# Altium PCB FMUM.PcbDoc (part 4 of 4)
Units mm, origin at the board's own origin, x right, y up, seen from the top; angles counter-clockwise.
Board outline 36 x 29 mm, 8 copper layers (Top Layer, GND1, Signal1, GND2, PWR1, Signal2, GND3, Bottom Layer), stack 1.01 mm thick; 117 components, 167 nets, 719 pads, 811 vias.
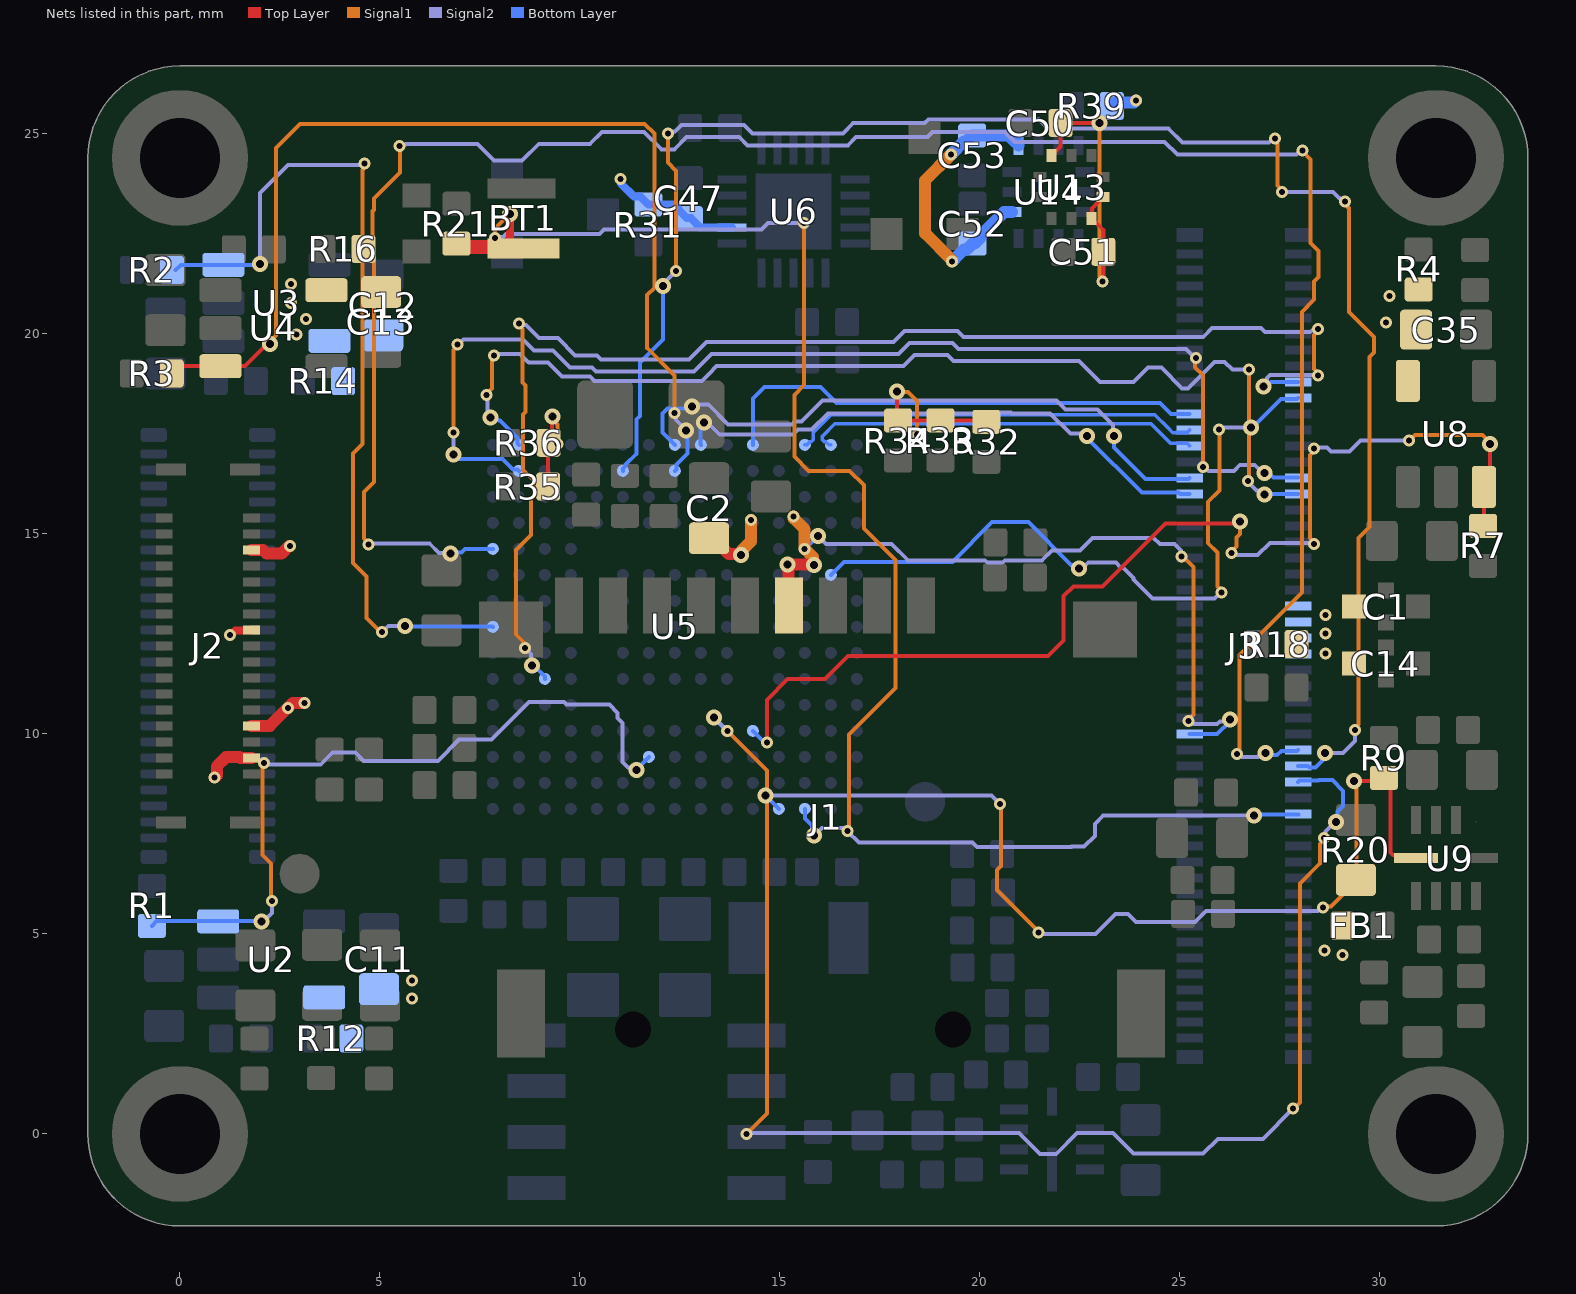
[diagram p10: the nets of this part, all layers, seen from the top]

## Via types
v1: diameter 0.3, hole 0.15, Top Layer to Bottom Layer, tented both sides, 279 vias
v2: diameter 0.3, hole 0.15, Signal1 to Signal2, tented both sides, 267 vias
v3: diameter 0.4, hole 0.2, Signal2 to Bottom Layer, tented both sides, 209 vias
v4: diameter 0.4, hole 0.2, Top Layer to Signal1, tented both sides, 54 vias
v5: diameter 0.3, hole 0.15, Top Layer to Bottom Layer, tented top, 2 vias

## Nets (pads, with @x,y where several pads share a name; then routed paths per layer and width w, separated by ;. In a path a pad name is that pad's centre, name@x,y a point inside that pad or via, vN(x,y) a via of type N, cw(c..) or ccw(c..) an arc to the next point about the centre after c; other vN are vias at no path point) (continued)
USART2_TX_TELEM3: J3.40 U5.C11 | length 17
  Signal1 w0.1: v2(25.039,14.432) 25.084,14.386 25.123,14.386 25.334,14.176 25.334,10.48 25.209,10.355 v2(25.209,10.322)
  Signal2 w0.1: v3(15.948,14.952) 15.953,14.952 16.156,14.748 17.793,14.748 18.199,14.342 18.465,14.342 20.132,14.342 20.191,14.283 20.564,14.283 20.623,14.342 21.557,14.342 21.798,14.583 22.502,14.583 22.818,14.899 24.341,14.899 24.496,14.744 24.868,14.744 25.027,14.584 25.027,14.524 25.039,14.513 v2(25.039,14.432) ; v2(25.209,10.322) 25.263,10.322 25.342,10.243 25.93,10.243 26,10.313 26.202,10.313 v3(26.249,10.359)
  Bottom Layer w0.1: U5.C11@15.623,14.627 v3(15.948,14.952) ; J3.40@25.245,10 25.249,9.996 25.93,9.996 26.249,10.314 v3(26.249,10.359)
USART3_RX_DEBUG: J3.71 U5.P14 | length 29.3
  Signal1 w0.1: v2(6.845,17.541) 6.845,19.592 6.934,19.682 v2(6.934,19.736) ; v2(25.397,19.402) 25.382,19.387 25.382,19.163 25.572,18.973 v2(25.571,16.67) v2(25.571,16.67)
  Signal2 w0.1: v3(6.845,16.991) v2(6.845,17.541) ; v2(6.934,19.736) 6.971,19.736 7.093,19.858 8.581,19.858 8.852,19.588 9.322,19.588 9.328,19.587 9.75,19.165 9.903,19.165 10.304,19.165 10.406,19.063 12.856,19.063 13.286,19.493 17.961,19.493 18.242,19.774 19.318,19.774 19.468,19.625 25.15,19.625 25.373,19.402 v2(25.397,19.402) ; v2(25.571,16.67) 25.625,16.67 25.716,16.578 26.347,16.578 26.498,16.729 26.869,16.729 27.069,16.529 v3(27.113,16.529)
  Bottom Layer w0.1: v3(6.845,16.991) 6.96,16.877 8.063,16.877 8.324,16.615 8.434,16.615 U5.P14@8.473,16.577 ; v3(27.113,16.529) 27.171,16.472 27.27,16.472 27.335,16.407 J3.71@27.948,16.407
USART3_TX_DEBUG: J3.69 U5.P15 | length 27.4
  Signal1 w0.1: v2(7.67,18.478) 7.67,18.5 7.808,18.637 7.808,19 7.808,19.364 7.848,19.404 v2(7.848,19.458) ; v2(26.703,16.329) 26.721,16.347 v2(26.721,19.107)
  Signal2 w0.1: v2(7.67,18.478) 7.689,18.46 7.689,18.061 7.763,17.986 v3(7.763,17.905) ; v2(7.848,19.458) 7.886,19.496 8.498,19.496 8.699,19.295 8.72,19.295 8.728,19.288 9.198,19.288 9.485,19 9.547,18.939 10.247,18.939 10.363,18.823 13.047,18.823 13.224,19 13.417,19.193 18.085,19.193 18.366,19.474 19.194,19.474 19.343,19.325 22.482,19.325 23.007,18.8 23.845,18.8 24.205,19.16 24.536,19.16 25.057,18.64 25.201,18.64 25.865,19.304 26.113,19.304 26.31,19.107 v2(26.721,19.107) ; v2(26.703,16.329) 26.703,16.303 26.918,16.089 26.936,16.089 27.034,15.991 v3(27.115,15.991)
  Bottom Layer w0.1: v3(7.763,17.905) 7.821,17.848 7.955,17.848 7.972,17.831 8,17.831 8.434,17.397 8.434,17.265 U5.P15@8.473,17.227 ; v3(27.115,15.991) 27.119,15.995 J3.69@27.95,15.995
USART6_RX_FROM_IO__RC_INPUT: J3.70 U5.G15 | length 14
  Signal2 w0.1: v3(13.108,17.784) 13.189,17.784 13.485,17.488 15.332,17.488 15.449,17.605 15.789,17.605 16.201,18.016 18.465,18.016 19.95,18.016 19.967,18.033 20.777,18.033 20.794,18.016 21.757,18.016 22.265,17.509 22.621,17.509 v3(22.678,17.452)
  Bottom Layer w0.1: U5.G15@13.023,17.227 13.011,17.239 13.011,17.606 13.108,17.703 v3(13.108,17.784) ; v3(22.678,17.452) 22.678,17.403 24.046,16.035 24.965,16.035 25,16 J3.70@25.245,16
USART6_TX_TO_IO__NC: J3.72 U5.H15 | length 15.8
  Signal2 w0.1: v3(12.808,18.184) 12.865,18.242 13.206,18.242 13.706,17.741 15.303,17.741 15.366,17.805 15.537,17.805 16.065,18.333 18.465,18.333 21.918,18.333 22.136,18.115 22.941,18.115 23.33,17.727 23.33,17.472 v3(23.35,17.452)
  Bottom Layer w0.1: U5.H15@12.373,17.227 12.065,17.534 12.065,18.013 12.191,18.138 12.761,18.138 v3(12.808,18.184) ; v3(23.35,17.452) 23.35,17.156 24.136,16.369 25.214,16.369 J3.72@25.245,16.4
USB_D_N: J3.78 U5.C15 | length 10.3
  Bottom Layer w0.089: U5.C15@15.623,17.227 15.677,17.227 15.75,17.3 15.774,17.3 15.833,17.358 15.833,17.536 16.278,17.982 24.373,17.982 24.706,17.648 24.824,17.531 24.906,17.531 24.91,17.535 25.18,17.535 J3.78@25.245,17.6
USB_D_P: J3.76 U5.B15 | length 9.9
  Bottom Layer w0.089: U5.B15@16.273,17.227 16.219,17.227 16.146,17.3 16.121,17.3 16.063,17.358 16.063,17.441 16.373,17.752 24.278,17.752 24.476,17.553 24.764,17.265 25.18,17.265 J3.76@25.245,17.2
V_RTC_BAT: BT1.1 J3.29 R21.2 U5.C1 | length 43.4
  Top Layer w0.2: v4(8.25,23) 8.25,22.276 8.224,22.25 7,22.25 7.148,22.102 8.554,22.102 BT1.1@8.591,22.138
  Signal1 w0.1: v2(7.883,22.4) 7.883,22.633 v4(8.25,23) ; v2(15.604,22.768) 15.604,18.72 15.36,18.476 15.36,16.933 15.717,16.575 16.742,16.575 17.097,16.221 17.097,15.133 17.884,14.346 17.884,11.148 16.727,9.99 16.727,7.604 v2(16.694,7.571)
  Signal2 w0.1: v2(7.883,22.4) 7.912,22.429 8.083,22.429 8.154,22.5 10.49,22.5 10.601,22.611 14.542,22.611 14.699,22.768 v2@15.604,22.768 ; v3(15.846,7.459) 15.865,7.459 16.054,7.649 16.561,7.649 16.639,7.571 v2(16.694,7.571) 16.694,7.563 16.971,7.285 19.818,7.285 19.926,7.177 22.289,7.177 22.293,7.182 22.608,7.182 22.871,7.446 22.871,7.747 23.079,7.955 26.841,7.955 v3(26.852,7.965)
  Bottom Layer w0.1: U5.C1@15.623,8.127 15.631,8.118 15.631,7.886 15.804,7.713 15.804,7.5 v3(15.846,7.459) ; v3(26.852,7.965) 26.877,7.991 J3.29@27.968,7.991
VBUS_SENSE: J3.80 U5.E15 | length 12.5
  Bottom Layer w0.1: U5.E15@14.323,17.227 14.323,18.381 14.614,18.672 16.02,18.672 16.416,18.276 18.465,18.276 ; 18.465,18.276 24.495,18.276 ; 24.495,18.276 24.503,18.276 24.779,18 J3.80@25.245,18
VDD_3V3_SD_CARD: C2.2 FB1.2 J1.4 R20.2 R32.2 R33.2 R34.2 R35.2 R36.2 | length 11.7
  Top Layer w0.1: R35.2@9.208,16.183 9.208,17.513 9.24,17.513 9.297,17.569 9.297,17.929 v4(9.308,17.941) ; v4(17.922,18.555) 17.922,17.868 R34.2@17.955,17.835 18.778,17.835 R33.2@18.786,17.827 ; R33.2@19.013,17.841 R32.2@20.046,17.841
  Top Layer w0.3: C2.2@13.229,14.892 13.329,14.892 13.728,14.493 14.002,14.493 v4(14.021,14.474) ; J1.4@15.229,13.216 15.209,13.236 15.209,14.214 v4(15.19,14.233) 15.834,14.233 v4(15.847,14.219)
  Signal1 w0.1: v4(9.308,17.941) 9.308,17.868 9.444,17.732 v2(9.444,17.254) ; v4(17.922,18.555) 17.935,18.543 18.204,18.543 18.429,18.318 v2(18.429,17.487)
  Signal1 w0.3: v4(14.021,14.474) 14.04,14.493 14.04,14.579 14.272,14.811 14.272,15.34 v2(14.276,15.343) ; v2(15.345,15.44) 15.345,15.391 15.62,15.116 v2(15.62,14.626) 15.828,14.418 15.828,14.239 v4(15.847,14.219)
  other v5: 29.063,4.473 28.612,4.584
VDD_3V3_SD_CARD_EN: R9.1 U5.D1 U9.5 | length 24.8
  Top Layer w0.1: v4(29.35,8.827) R9.1@30.173,8.827 ; R9.1@30.1,8.9 R9.1@30.173,8.827 ; U9.5@30.897,6.898 30.822,6.973 30.343,6.973 30.339,6.977 30.328,6.977 30.27,7.035 30.27,8.73 R9.1@30.173,8.827
  Signal1 w0.1: v2(20.5,8.25) 20.532,8.218 20.532,6.703 20.431,6.601 20.431,6.099 21.47,5.06 v2(21.47,5.038) ; v2(28.582,5.654) 28.612,5.684 28.777,5.684 29.413,6.32 29.413,8.619 29.407,8.624 29.407,8.77 v4(29.35,8.827)
  Signal2 w0.1: v3(14.641,8.458) 20.292,8.458 v2(20.5,8.25) ; v2(21.47,5.038) 21.508,5 22.884,5 23.384,5.5 23.7,5.5 23.9,5.3 25.381,5.3 25.657,5.575 28.449,5.575 28.528,5.654 v2(28.582,5.654)
  Bottom Layer w0.1: v3(14.641,8.458) U5.D1@14.973,8.127
VDD_3V3_SENSORS1: C35.2 C52.2 C53.2 R4.2 R39.2 U8.5 U14.5 U14.8 | length 7.9
  Signal1 w0.3: v1(19.276,24.485) 18.631,23.84 18.631,22.516 19.301,21.845 v1(19.301,21.812)
  Bottom Layer w0.3: v1(19.276,24.485) 19.604,24.813 19.657,24.813 C53.2@19.807,24.963 20.715,24.963 20.88,24.798 20.943,24.798 20.968,24.773 U14.8@20.968,24.71 ; v1(19.301,21.812) 19.354,21.865 19.358,21.865 19.6,22.106 19.666,22.106 C52.2@19.816,22.256 ; C52.2@19.866,22.256 20.016,22.406 20.016,22.456 20.608,23.048 U14.5@20.805,23.048 ; R39.2@23.3,25.7 23.39,25.79 23.852,25.79 v1(23.904,25.841)
  other v1: 30.157,20.286 30.233,20.948
VDD_3V3_SENSORS1_EN: R7.1 U5.E4 U8.3 | length 28.3
  Top Layer w0.1: v1(14.678,9.784) 14.678,10.852 15.193,11.367 16.128,11.367 16.707,11.946 21.705,11.946 22.095,12.336 22.095,13.448 22.334,13.687 23.064,13.687 24.635,15.258 26.452,15.258 v4(26.502,15.307) ; R7.1@32.579,15.202 32.598,15.222 U8.3@32.598,16.176 32.75,16.327 v4(32.75,17.25)
  Signal1 w0.1: v2(26.287,14.528) 26.287,14.561 26.413,14.687 26.413,14.906 26.502,14.995 v4(26.502,15.307) ; v2(28.352,14.75) 28.352,14.804 28.252,14.904 28.252,16.977 28.352,17.077 v2(28.352,17.131) ; v2(30.721,17.339) 30.749,17.339 30.88,17.471 32.559,17.471 32.75,17.279 v4(32.75,17.25)
  Signal2 w0.1: v2(26.287,14.528) 26.325,14.49 26.422,14.49 26.445,14.467 26.944,14.467 27.248,14.771 28.33,14.771 v2(28.352,14.75) ; v2(28.352,17.131) 28.378,17.157 28.682,17.157 28.778,17.061 29.239,17.061 29.517,17.339 v2(30.721,17.339)
  Bottom Layer w0.1: U5.E4@14.323,10.077 14.577,9.822 14.639,9.822 v1(14.678,9.784)
VDD_3V3_SENSORS2: C11.2 C50.2 C51.2 J2.32 R12.2 U2.5 U13.1 U13.5 U13.10 | length 9.5
  Top Layer w0.1: U13.5@21.793,24.46 21.793,24.498 21.868,24.573 21.906,24.573 22.014,24.681 C50.2@22.014,25.273 v4(22.993,25.273) ; U13.10@22.793,22.848 22.868,22.773 22.906,22.773 23.083,22.595 C51.2@23.083,22.054 23.083,21.323 v1(23.07,21.309) ; U13.10@22.793,22.885 22.797,22.889 22.797,23.139 22.968,23.31 22.968,23.348 23.043,23.423 U13.1@23.081,23.423
  Top Layer w0.3: v1(0.866,8.907) 0.922,8.963 0.922,9.188 1.157,9.423 1.488,9.423 1.511,9.4 J2.32@1.79,9.4
  Signal1 w0.1: v4(22.993,25.273) 22.993,21.44 23.07,21.363 v1(23.07,21.309)
  other v1: 5.802,3.38 5.806,3.832
VDD_3V3_SENSORS2_EN: R1.1 U2.3 U5.J3 | length 18.9
  Signal1 w0.1: v2(2.099,9.271) 2.061,9.234 2.061,6.969 2.274,6.756 2.274,5.859 v2(2.305,5.827)
  Signal2 w0.1: v3(2.042,5.314) 2.094,5.314 2.305,5.525 v2(2.305,5.827) ; v2(2.099,9.271) 2.137,9.234 3.52,9.234 3.818,9.531 4.384,9.531 4.587,9.329 6,9.329 6.446,9.329 6.979,9.862 7.79,9.862 8.721,10.793 9.607,10.793 9.669,10.731 10.739,10.731 10.945,10.525 10.945,10.398 11.07,10.274 11.07,9.299 11.207,9.162 11.351,9.162 v3(11.409,9.104)
  Bottom Layer w0.1: R1.1@-0.7,5.2 -0.581,5.319 2.036,5.319 v3(2.042,5.314) ; v3@11.409,9.105 11.723,9.419 U5.J3@11.723,9.427
VDD_3V3_SENSORS3: C12.2 J2.6 R14.2 U3.5 | length 1.1
  Top Layer w0.3: J2.6@1.79,14.6 2.073,14.6 2.167,14.506 2.54,14.506 2.736,14.702 v1(2.756,14.702)
  other v1: 2.917,19.99 3.149,20.375
VDD_3V3_SENSORS3_EN: R2.1 U3.3 U5.R8 | length 21.9
  Signal1 w0.1: v2(4.616,24.262) 4.578,24.224 4.578,24.116 4.565,24.103 4.565,17.246 4.328,17.009 4.328,14.276 4.665,13.94 4.665,12.904 5.015,12.554 v2(5.05,12.554)
  Signal2 w0.1: v3(2,21.75) 2,23.525 2.698,24.224 4.578,24.224 v2(4.616,24.262) ; v2(5.05,12.554) 5.059,12.554 5.209,12.704 v3(5.626,12.704)
  Bottom Layer w0.1: R2.1@-0.107,21.593 0.027,21.727 U3.3@1.088,21.727 1.977,21.727 v3(2,21.75) ; v3(5.626,12.704) 5.641,12.689 7.81,12.689 U5.R8@7.823,12.677
VDD_3V3_SENSORS4: C13.2 C47.2 J2.16 R16.2 R31.2 U4.5 U6.12 | length 3.9
  Top Layer w0.2: v1(1.247,12.476) 1.274,12.476 1.383,12.585 1.775,12.585 J2.16@1.79,12.6
  Bottom Layer w0.2: v1(11.01,23.877) 11.029,23.858 11.029,23.755 11.351,23.433 11.509,23.433 R31.2@11.709,23.233 12.358,23.233 12.475,23.116 12.475,23.093 12.675,22.893 C47.2@12.725,22.893 ; C47.2@12.775,22.893 13.005,22.664 U6.12@13.803,22.664
  other v1: 2.772,20.779 2.772,21.246
VDD_3V3_SENSORS4_EN: R3.1 U4.3 U5.H14 | length 26.2
  Top Layer w0.1: 0.1,19.2 0.108,19.192 U4.3@1.012,19.192 1.023,19.203 1.628,19.203 2.175,19.75 v4(2.25,19.75)
  Signal1 w0.1: v4(2.25,19.75) 2.25,19.809 2.4,19.959 2.4,24.65 3,25.25 11.62,25.25 11.86,25.01 11.86,21.151 11.678,20.969 11.678,19.654 12.332,19 12.37,18.963 v2(12.37,18.026)
  Signal2 w0.1: v2(12.37,18.026) 12.408,17.988 12.408,17.849 12.651,17.605 v3(12.651,17.58)
  Bottom Layer w0.1: U5.H14@12.373,16.577 12.411,16.615 12.411,16.73 12.686,17.006 12.686,17.545 v3(12.651,17.58)
VDD_3V3_SPEKTRUM_POWER_EN: J3.33 U5.F4 | length 36.2
  Signal1 w0.1: v2(13.693,10.069) 14.672,9.089 14.672,6.736 14.672,0.506 v2(14.162,-0.005) ; v2(27.831,0.631) 27.841,0.631 28,0.789 28,6.265 28.501,6.767 28.501,7.247 28.6,7.346 v2(28.6,7.4)
  Signal2 w0.1: v3(13.347,10.415) v2(13.693,10.069) ; v2(14.162,-0.005) 14.19,0.023 20.981,0.023 21.506,-0.502 21.908,-0.502 22.427,0.017 23.33,0.017 23.841,-0.494 25.582,-0.494 25.951,-0.125 27.075,-0.125 v2(27.831,0.631) ; v2(28.6,7.4) 28.638,7.438 28.638,7.557 28.881,7.8 v3(28.9,7.8)
  Bottom Layer w0.1: v3(13.347,10.415) 13.347,10.402 U5.F4@13.673,10.077 ; J3.33@27.955,8.8 27.99,8.835 28.469,8.835 28.479,8.845 28.81,8.845 29.082,8.573 29.082,8.199 28.939,8.056 28.939,7.839 v3(28.9,7.8)
VDD_5V_HIPOWER_nEN: J3.81 U5.B10 | length 18
  Signal1 w0.1: v2(25.972,17.616) 25.989,17.599 25.989,16.089 25.696,15.796 25.696,14.771 25.934,14.533 25.934,13.684 26.034,13.584 v2(26.034,13.53)
  Signal2 w0.1: v3(22.479,14.133) 22.558,14.133 22.708,14.283 23.396,14.283 23.515,14.164 23.577,14.164 23.843,13.898 23.843,13.86 24.315,13.387 25.863,13.387 26.006,13.53 v2(26.034,13.53) ; v2(25.972,17.616) 26.011,17.654 26.124,17.654 26.131,17.662 v3(26.775,17.662)
  Bottom Layer w0.1: U5.B10@16.273,13.977 16.598,14.302 19.31,14.302 20.301,15.293 21.214,15.293 22.279,14.228 22.303,14.228 22.398,14.133 v3(22.479,14.133) ; v3(26.775,17.662) 26.815,17.662 27.53,18.377 27.932,18.377 J3.81@27.955,18.4
VDD_5V_HIPOWER_nOC: J3.83 U5.N6 | length 34.2
  Signal1 w0.1: v2(8.478,20.261) 8.478,20.206 8.566,20.119 8.566,19 8.566,18.791 8.641,18.716 8.641,18.05 8.582,17.991 8.582,16.598 8.862,16.317 8.862,15.959 8.776,15.873 8.776,14.974 8.405,14.603 8.405,12.481 8.586,12.3 8.586,12.191 v2(8.624,12.152) ; v2(28.457,18.964) 28.457,19.018 28.357,19.118 28.357,19.969 28.457,20.069 v2(28.457,20.123)
  Signal2 w0.1: v2(8.478,20.261) 8.517,20.222 8.647,20.222 8.975,19.894 9.451,19.894 9.88,19.465 10.428,19.465 10.53,19.363 12.732,19.363 13.162,19.793 17.837,19.793 18.118,20.074 19.442,20.074 19.592,19.925 25.583,19.925 25.804,20.145 26.551,20.145 27.024,20.145 27.126,20.043 28.257,20.043 28.298,20.084 28.418,20.084 v2(28.457,20.123) ; v2(8.624,12.152) v2(8.624,12.152) 8.781,11.994 8.781,11.732 v3(8.798,11.715) ; v3(27.086,18.684) 27.086,18.766 27.173,18.852 27.173,18.893 27.254,18.974 28.234,18.974 28.238,18.97 28.451,18.97 v2(28.457,18.964)
  Bottom Layer w0.1: v3(8.798,11.715) 8.837,11.715 9.123,11.43 U5.N6@9.123,11.377 ; v3(27.086,18.684) 27.167,18.684 27.283,18.8 J3.83@27.955,18.8
VDD_5V_IN: C1.1 C14.1 J2.28 J3.49 J3.51 J3.53 J3.55 R18.2 | length 1.6
  Top Layer w0.3: J2.28@1.79,10.2 2.246,10.2 v1(2.7,10.654) 2.824,10.778 v1(3.117,10.778)
  other v1: 28.642,12.017 28.644,12.508 28.637,12.969
VDD_5V_PERIPH_nEN: J3.35 U5.K14 | length 43.7
  Signal1 w0.1: v2(12.201,25.017) 12.201,24.284 12.406,24.079 v2(12.406,21.574) ; v2(27.377,24.881) 27.377,24.827 27.437,24.766 27.437,23.706 27.551,23.592 v2(27.551,23.548) ; v2(29.127,23.313) 29.127,23.259 29.205,23.182 29.205,23.166 29.223,23.148 29.223,20.55 29.851,19.922 29.851,19.538 29.741,19.429 29.741,15.175 29.459,14.893 29.459,10.24 29.376,10.158 v2(29.376,10.104)
  Signal2 w0.1: v3(12.082,21.2) 12.082,21.25 v2(12.406,21.574) ; v2(12.201,25.017) 12.239,25.055 12.381,25.055 12.544,25.218 14.107,25.218 14.316,25.01 16.571,25.01 16.833,25.272 18.62,25.272 18.712,25.364 21.472,25.364 21.707,25.129 24.715,25.129 25.063,24.781 27.222,24.781 27.322,24.881 v2(27.377,24.881) ; v2(27.551,23.548) 28.828,23.548 28.983,23.393 28.994,23.393 29.073,23.313 v2(29.127,23.313) ; v3(28.625,9.525) 28.627,9.527 29.077,9.527 29.376,9.827 v2(29.376,10.104)
  Bottom Layer w0.1: U5.K14@11.073,16.577 11.073,16.631 11.14,16.698 11.14,16.734 11.409,17.003 11.409,17.861 11.497,17.95 11.497,19.282 12.074,19.859 12.074,21.193 v3(12.082,21.2) ; J3.35@27.955,9.2 28.2,9.2 28.235,9.165 28.394,9.165 28.568,9.339 28.568,9.468 v3(28.625,9.525)
VDD_5V_PERIPH_nOC: J3.37 U5.R11 | length 55.3
  Signal1 w0.1: v2(4.709,14.731) 4.709,14.78 4.599,14.89 4.599,16.05 4.851,16.302 4.851,22.112 4.816,22.147 4.816,23.069 4.851,23.104 4.851,23.39 5.5,24.039 5.5,24.689 v2(5.492,24.697) ; v2(26.427,9.494) 26.427,9.549 26.493,9.615 26.493,11.975 28.052,13.533 28.052,20.552 28.355,20.855 28.355,21.31 28.465,21.42 28.465,22.075 28.268,22.272 28.268,24.364 28.071,24.561 v2(28.071,24.581)
  Signal2 w0.1: v2(4.709,14.731) 4.732,14.754 6,14.754 6.246,14.754 6.474,14.526 6.749,14.526 v3(6.759,14.517) ; v2(5.492,24.697) 5.53,24.735 5.641,24.735 5.651,24.744 7.444,24.744 7.853,24.335 8.555,24.335 8.974,24.754 10.253,24.754 10.546,25.047 11.605,25.047 12.036,24.617 12.367,24.617 12.669,24.918 13.983,24.918 14.191,24.71 16.696,24.71 16.904,24.918 18.69,24.918 18.819,25.047 20.631,25.047 20.875,24.803 24.617,24.803 24.939,24.481 27.916,24.481 28.016,24.581 v2(28.071,24.581) ; v2(26.427,9.494) 26.481,9.494 26.551,9.425 26.952,9.425 27.053,9.525 v3(27.134,9.525)
  Bottom Layer w0.1: v3(6.759,14.517) 6.777,14.535 7.035,14.535 7.127,14.627 U5.R11@7.823,14.627 ; v3(27.134,9.525) 27.191,9.469 27.425,9.469 27.534,9.577 27.932,9.577 J3.37@27.955,9.6
pads on no net: J1.9 J1.14 J1.15 J2.9 J2.11 J2.13 J2.17 J2.19 J2.21 J2.25 J2.27 J2.29 J4.22 J4.24 J4.26 J4.28 J4.30 J4.32 J4.34 J4.36 J4.38 J4.40 J4.42 J4.50 U2.4 U3.4 U4.4 U6.2 U6.3 U6.4 U6.5 U6.6 U6.7 U6.8 U6.13 U6.16 U6.20 U8.4 U9.2 U9.3 U9.4 U11.2 U11.3 U11.4 U14.2 U14.3 U14.10 U14.11

## Polygon pours and split planes (outlines as drawn)
GND on Top Layer "TOP_LAYER_NONET_P060" (hatched 90Degree grid 0.4 track 0.1, shelved, pour order 60): -2.3,0 ccw(c0,0) 0,-2.3 31.4,-2.3 ccw(c31.4,0) 33.7,0 33.7,24.4 ccw(c31.4,24.4) 31.4,26.7 0,26.7 ccw(c0,24.4) -2.3,24.4
VDD_5V_IN on Top Layer "L1_L8_VDD_5V_IN" (solid, shelved, pour order 44): 27.7,12.6 27.6,12.5 27.6,12 27.7,11.9 28.5,11.9 28.539,11.861 28.984,11.861 29.051,11.794 29.051,11.549 29.137,11.463 29.663,11.463 29.7,11.5 29.7,13.4 29.6,13.5 29.2,13.5 29.1,13.4 29.1,13.2 29,13.1 28.5,13.1 28.4,13 28.4,12.7 28.3,12.6
FMU_VDD_3V3 on Top Layer "TOP_LAYER_NONET_P056" (solid, shelved, pour order 56): 7.7,10.6 7.8,10.5 7.9,10.5 8,10.4 8,8.6 7.8,8.4 6.9,8.4 6.8,8.5 6.8,10.9 6.9,11 7.3,11 7.4,10.9 7.3,11 7.4,10.9
FMU_VDD_3V3 on Top Layer "TOP_LAYER_NONET_P058" (solid, shelved, pour order 58): 9.6,18.8 9.5,18.7 9.5,18.5 9.6,18.4 9.8,18.4 9.9,18.3 9.9,16.8 9.8,16.7 9.8,16.3 9.9,16.2 12.4,16.2 12.5,16.3 12.5,16.7 12.3,16.9 12,16.9 11.9,17 11.9,18.7 11.8,18.8
FMU_VDD_3V3 on Top Layer "TOP_LAYER_NONET_P047" (solid, shelved, pour order 47): 20.1,15.1 20.1,15 20.1,14.5 19.9,14.3 19.7,14.3 19.5,14.1 19.5,13.4 19.6,13.3 19.9,13.3 20.1,13.5 20.6,13.5 20.7,13.6 20.7,15.1 20.6,15.2 20.2,15.2
VDD_3V3_SENSORS1 on Top Layer "L1_LDO_3V3_SENSORS1" (solid, shelved, pour order 32): 30.4,20 30.3,20.1 30.1,20.1 30,20.2 30,21 30.4,21.4 31.2,21.4 31.3,21.3 31.3,19.7 31.2,19.6 31,19.4 31,18.4 30.9,18.3 30.5,18.3 30.4,18.4
FMU_VDD_3V3 on Top Layer "L1-L8_3V3_FMU" (solid, shelved, pour order 46): 25.1,7.9 25.2,7.8 25.2,6.8 25.4,6.6 25.4,5.2 25.3,5.1 24.2,5.1 24.1,5.2 24.1,6.3 24,6.4 23.5,6.4 23.4,6.5 23.4,6.7 23.5,6.8 23.8,6.8 23.9,6.9 23.9,7.6 23.8,7.7 23.8,7.9 23.9,8 24.1,8 24.2,7.9
VDD_3V3_SD_CARD on Top Layer "L1_SW_3V3_FMU" (solid, shelved, pour order 43): 29,6.7 28.9,6.6 28.9,5.7 28.8,5.6 28.8,4.9 28.7,4.8 28.5,4.8 28.4,4.7 28.4,4.5 28.5,4.4 28.7,4.4 28.8,4.3 28.9,4.3 29,4.2 29.1,4.2 29.3,4.4 29.3,4.8 29.4,4.9 29.4,5.6 29.7,5.9 29.8,5.9 29.9,6 29.9,6.6 29.8,6.7
NetR5_1 on Top Layer "L1_SW_3V3_FMU" (solid, shelved, pour order 54): 32.6,6.3 32.6,4.3 32.7,4.2 32.7,3.7 32.6,3.6 32,3.6 31.9,3.7 31.9,5.2 32,5.3 32.1,5.3 32.27,5.47 32.27,6.3
NetC30_2 on Top Layer "L1_SW_3V3_FMU" (solid, shelved, pour order 42): 32,6.3 32,5.6 31.9,5.5 31.6,5.5 31.5,5.4 31.5,3.5 31.4,3.4 30.6,3.4 30.3,3.7 29.6,3.7 29.5,3.8 29.5,4.3 29.8,4.6 29.8,5.5 29.9,5.6 30.7,5.6 30.8,5.7 30.8,6.3
FMU_VDD_5V on Top Layer "L1_SW_3V3_FMU" (solid, shelved, pour order 41): 31.9,11.4 32.6,10.7 32.6,9.7 32.7,9.6 32.9,9.6 33,9.5 33,8.7 32.8,8.5 32.7,8.5 32.6,8.4 32.6,7.5 32.5,7.4 32.2,7.4 32.2,8.5 32.1,8.6 32.1,9.6 31.9,9.8 31.9,10.5 31,11.4 30.7,11.4 30.6,11.5 30.6,12 30.7,12.1 31.4,12.1 31.6,12.3 31.8,12.3 31.9,12.2
SENSORS_VDD_5V on Top Layer "L1_LDO_3V3_SENSORS4" (solid, shelved, pour order 39): -0.9,21.3 -0.8,21.2 -0.9,21.3 -0.9,21.9 -0.8,22 -0.7,22 -0.6,22.1 -0.6,22.4 -0.5,22.5 0.2,22.5 0.4,22.3 0.4,21.5 0.5,21.4 1.4,21.4 1.5,21.3 1.5,20.9 1.4,20.8 0.4,20.8 0.1,21.1 -0.8,21.1 -0.9,21.2
VDD_3V3_SENSORS4 on Top Layer "L1_LDO_3V3_SENSORS4" (solid, shelved, pour order 38): 4.4,22.5 4.3,22.4 4.3,21.7 4,21.4 2.7,21.4 2.6,21.3 2.6,20.7 2.7,20.6 2.9,20.6 3.1,20.8 4.4,20.8 4.6,20.6 5.5,20.6 5.6,20.7 5.6,21.4 5.5,21.5 5.1,21.5 4.9,21.7 4.9,22.4 4.8,22.5
SENSORS_VDD_5V on Top Layer "L1_LDO_3V3_SENSORS1" (solid, shelved, pour order 37): 31.3,13.8 31.4,13.7 31.7,13.7 31.8,13.6 31.8,12.8 31.7,12.7 31.3,12.7 31.2,12.8 30.7,12.8 30.6,12.9 30.6,13.7 30.4,13.9 29.9,13.9 29.7,14.1 29.7,15.2 29.8,15.3 30,15.3 30.4,15.7 30.4,16.6 30.5,16.7 30.9,16.7 31,16.6 31,15.5 30.8,15.3 30.8,14.3
no net on Top Overlay (none, shelved): 9.84,22.888 ccw(c13.341,22.888) 13.341,19.388 ccw(c13.341,22.888) 16.841,22.888 ccw(c13.341,22.888) 13.341,26.389 ccw(c13.341,22.888)
GND on Bottom Layer "BOTTOM_LAYER_NONET_P057" (hatched 90Degree grid 0.4 track 0.1, remove dead copper, shelved, pour order 57): -2.3,0 -2.3,24.4 cw(c0,24.4) 0,26.7 31.4,26.7 cw(c31.4,24.4) 33.7,24.4 33.7,0 cw(c31.4,0) 31.4,-2.3 0,-2.3 cw(c0,0)
NetR8_1 on Bottom Layer "L8_SW_3V3_SD_CARD" (solid, shelved, pour order 49): 19.7,1.8 19.6,1.7 19.6,0.5 19.4,0.3 19.4,-0.1 19.5,-0.2 20,-0.2 20.1,-0.1 20.1,0.3 20.299,0.499 21.201,0.499 21.2,0.5 21.2,0.8 20.7,0.8 20.2,1.3 20.2,1.7 20.1,1.8
FMU_VDD_5V on Bottom Layer "L8_SW_3V3_SD_CARD" (solid, shelved, pour order 50): 22.3,0.6 22.5,0.8 23,0.8 23.4,1.2 23.4,1.7 23.5,1.8 23.9,1.8 24,1.7 24.1,1.6 24.4,1.6 24.6,1.4 24.6,0.7 24.7,0.6 24.9,0.6 25,0.5 25,0 24.9,-0.1 23.6,-0.1 23.5,0 23.5,0.3 23.4,0.4 22.3,0.4
FMU_VDD_3V3 on Bottom Layer "L8_SW_3V3_SD_CARD" (solid, shelved, pour order 52): 18.3,1.5 18.4,1.4 18.4,0.9 18.3,0.8 17.2,0.8 16.8,1.2 16.8,1.5 17.1,1.8 17.7,1.8 18,1.5
FMU_VDD_3V3 on Bottom Layer "BOTTOM_LAYER_NONET_P053" (solid, shelved, pour order 53): 24.9,19.3 26.1,19.3 26.3,19.1 26.3,18.5 26.1,18.3 25.9,18.3 25.7,18.5 25.7,18.6 25.6,18.7 24.9,18.7
VDD_3V3_SENSORS3 on Bottom Layer "L8_LDO_3V3_SENSORS3" (solid, shelved, pour order 36): 3.6,20.1 3.4,20.3 3.4,20.4 3.261,20.539 3.039,20.539 2.9,20.4 2.7,20.2 2.7,20 2.9,19.8 3.2,19.5 3.6,19.5 3.8,19.3 3.8,18.6 3.9,18.5 4.3,18.5 4.4,18.6 4.4,19.4 4.6,19.6 5.5,19.6 5.6,19.7 5.6,20.3 5.5,20.4 4.6,20.4 4.5,20.3 4.3,20.1
NetC18_2 on Bottom Layer "L8_SW_3V3_SD_CARD" (solid, shelved, pour order 51): 18.9,1.5 18.8,1.4 18.8,0.9 18.5,0.6 18.4,0.6 18.3,0.5 18.3,-0.3 18.4,-0.4 18.5,-0.5 18.5,-1.3 18.6,-1.4 19,-1.4 19.1,-1.3 20,-1.3 20.1,-1.2 20.1,-1.1 20.2,-1 21.2,-1 21.2,0.2 20.5,0.2 20.4,0.1 20.4,-0.2 20.2,-0.4 19.2,-0.4 19.1,-0.3 19.1,0.6 19.3,0.8 19.4,0.9 19.4,1.4 19.3,1.5
VDD_5V_IN on Bottom Layer "L1_L8_VDD_5V_IN" (solid, shelved, pour order 45): 27.6,11.9 28.5,11.9 28.541,11.859 28.762,11.859 28.816,11.912 28.816,13.065 28.747,13.134 28.743,13.129 28.371,13.129 28.3,13.2 28.3,13.3 27.6,13.3 28.3,13.3 27.6,13.3
SENSORS_VDD_5V on Bottom Layer "L8_LDO_3V3_SENSORS3" (solid, shelved, pour order 35): -0.8,18.6 -0.7,18.6 -0.6,18.5 -0.6,18.2 -0.5,18.1 0.3,18.1 0.4,18.2 0.4,18.4 0.2,18.6 0.2,19 0.7,19.5 1.5,19.5 1.6,19.6 1.6,20 1.5,20.1 0.5,20.1 -0.2,19.4 -0.8,19.4 -0.9,19.3 -0.9,18.7
VDD_3V3_SENSORS2 on Bottom Layer "L8_LDO_3V3_SENSORS2" (solid, shelved, pour order 34): 5.9,4 6,3.9 6,3.3 5.9,3.2 5.5,3.2 5.1,3.2 4.6,2.7 4.6,2.1 4.5,2 4.1,2 4,2.1 4,2.8 3.7,3.1 3.2,3.1 3.1,3.2 3.1,3.6 3.2,3.7 4.3,3.7 4.5,3.9 4.6,4
SENSORS_VDD_5V on Bottom Layer "L8_LDO_3V3_SENSORS2" (solid, shelved, pour order 33): 1.5,3.2 1.4,3.1 0.3,3.1 0.1,2.9 0.1,2.4 0,2.3 -0.8,2.3 -1,2.5 -1.3,2.5 -1.4,2.6 -1.4,3.4 -1.3,3.5 0.3,3.5 0.5,3.7 1.4,3.7 1.5,3.6
FMU_VDD_3V3 on Signal1 "SIGNAL1_NONET_P055" (solid, shelved, pour order 55): 11.5,18.8 11.3,18.6 11.3,18.5 11.1,18.3 11.1,17.2 11.5,16.8 11.8,16.8 11.9,16.9 11.9,17.3 12,17.4 12.2,17.4 12.3,17.5 12.3,17.7 12.2,17.8 12.1,17.8 11.9,18 11.9,18.7 11.8,18.8
FMU_VDD_3V3 on Signal1 "L1_L8_VDD_5V_IN" (solid, shelved, pour order 48): 23.9,8 23.8,7.9 23.8,7.7 23.9,7.6 23.9,6.9 23.8,6.8 23.5,6.8 23.4,6.7 23.4,6.5 23.5,6.4 24.1,5.8 24.1,5.3 24.3,5.1 24.5,5.1 24.7,5.3 24.7,6.2 24.6,6.3 24.6,6.5 24.5,6.6 24.5,7.9 24.4,8
GND on GND1 (split plane): 31.576,26.183 31.75,26.157 31.92,26.114 32.086,26.055 32.245,25.98 32.395,25.89 32.537,25.785 32.667,25.667 32.785,25.537 32.89,25.395 32.98,25.245 33.055,25.086 33.114,24.92 33.157,24.75 33.183,24.576 33.191,24.414 33.19,24.4 33.19,0 33.191,-0.014 33.183,-0.176 33.157,-0.35 33.114,-0.52 33.055,-0.686 32.98,-0.845 32.89,-0.995 32.785,-1.137 32.667,-1.267 32.537,-1.385 32.395,-1.49 32.245,-1.58 32.086,-1.655 31.92,-1.714 31.75,-1.757 31.576,-1.783 31.414,-1.791 31.4,-1.79 0,-1.79 -0.014,-1.791 -0.176,-1.783 -0.35,-1.757 -0.52,-1.714 -0.686,-1.655 -0.845,-1.58 -0.995,-1.49 -1.137,-1.385 -1.267,-1.267 -1.385,-1.137 -1.49,-0.995 -1.58,-0.845 -1.655,-0.686 -1.714,-0.52 -1.757,-0.35 -1.783,-0.176 -1.791,-0.014 -1.79,0 -1.79,24.4 -1.791,24.414 -1.783,24.576 -1.757,24.75 -1.714,24.92 -1.655,25.086 -1.58,25.245 -1.49,25.395 -1.385,25.537 -1.267,25.667 -1.137,25.785 -0.995,25.89 -0.845,25.98 -0.686,26.055 -0.52,26.114 -0.35,26.157 -0.176,26.183 -0.014,26.191 0,26.19 31.4,26.19 31.414,26.191
VDD_3V3_SENSORS2 on PWR1 (split plane): 17.228,22.228 17.261,22.206 17.3,22.198 26.058,22.198 26.398,21.858 26.398,20.702 16.742,20.702 16.172,21.272 16.139,21.294 16.1,21.302 8.398,21.302 8.359,21.294 8.326,21.272 5.71,18.656 5.688,18.623 5.68,18.584 5.68,14.124 4.134,12.578 2.328,10.772 2.306,10.739 2.298,10.7 2.298,5.5 2.306,5.461 2.328,5.428 2.628,5.128 2.661,5.106 2.7,5.098 6.398,5.098 6.398,2.642 5.828,2.072 5.228,1.472 5.206,1.439 5.198,1.4 5.198,-1.7 5.198,-1.79 0,-1.79 -0.014,-1.791 -0.176,-1.783 -0.35,-1.757 -0.52,-1.714 -0.686,-1.655 -0.845,-1.58 -0.995,-1.49 -1.137,-1.385 -1.267,-1.267 -1.385,-1.137 -1.49,-0.995 -1.58,-0.845 -1.655,-0.686 -1.714,-0.52 -1.757,-0.35 -1.783,-0.176 -1.791,-0.014 -1.79,0 -1.79,2.098 -1,2.098 -0.961,2.106 -0.928,2.128 -0.028,3.028 -0.006,3.061 0.002,3.1 0.002,11.798 1.3,11.798 1.339,11.806 1.372,11.828 2.272,12.728 3.872,14.328 3.894,14.361 3.902,14.4 3.902,21.358 5.442,22.898 11.134,22.898 11.173,22.906 11.207,22.928 12.172,23.893 12.194,23.927 12.202,23.966 12.202,24.1 12.199,24.116 15.34,24.116
SENSORS_VDD_5V on PWR1 (split plane): 0,26.19 18.698,26.19 18.698,24.5 18.706,24.461 18.728,24.428 19.028,24.128 19.061,24.106 19.1,24.098 27.158,24.098 28.198,23.058 28.198,21.6 28.206,21.561 28.228,21.528 29.928,19.828 29.961,19.806 30,19.798 33.19,19.798 33.19,12.502 31.302,12.502 31.302,16 31.302,16.861 31.294,16.9 31.272,16.933 29.833,18.372 29.8,18.394 29.761,18.402 28.842,18.402 26.602,20.642 26.602,21.9 26.594,21.939 26.572,21.972 26.172,22.372 26.139,22.394 26.1,22.402 17.342,22.402 15.454,24.29 15.421,24.312 15.382,24.32 4.718,24.32 4.679,24.312 4.646,24.29 0.428,20.072 0.406,20.039 0.398,20 0.398,17.942 -0.172,17.372 -0.194,17.339 -0.202,17.3 -0.202,3.142 -1.042,2.302 -1.79,2.302 -1.79,24.4 -1.791,24.414 -1.783,24.576 -1.757,24.75 -1.714,24.92 -1.655,25.086 -1.58,25.245 -1.49,25.395 -1.385,25.537 -1.267,25.667 -1.137,25.785 -0.995,25.89 -0.845,25.98 -0.686,26.055 -0.52,26.114 -0.35,26.157 -0.176,26.183 -0.014,26.191
VDD_3V3_SENSORS3 on PWR1 (split plane): 3.698,14.442 2.302,13.046 2.302,19.758 3.172,20.628 3.698,21.154
VDD_3V3_SENSORS4 on PWR1 (split plane): 11.998,24.1 11.998,24.008 11.092,23.102 5.4,23.102 5.361,23.094 5.328,23.072 3.928,21.672 3.728,21.472 3.028,20.772 2.128,19.872 2.106,19.839 2.098,19.8 2.098,12.842 1.258,12.002 0.002,12.002 0.002,17.258 0.572,17.828 0.594,17.861 0.602,17.9 0.602,19.958 4.76,24.116 12.001,24.116
FMU_VDD_3V3 on PWR1 (split plane): 12.298,18.058 12.298,17.8 12.298,16.6 12.298,16.4 12.306,16.361 12.328,16.328 12.698,15.958 12.698,14.7 12.706,14.661 12.728,14.628 13.828,13.528 13.861,13.506 13.9,13.498 17.9,13.498 17.939,13.506 17.972,13.528 18.572,14.128 18.594,14.161 18.602,14.2 18.602,15.158 18.952,15.508 20.148,15.508 20.598,15.058 20.598,8.2 20.606,8.161 20.628,8.128 21.128,7.628 21.161,7.606 21.2,7.598 23.958,7.598 24.698,6.858 24.698,2.242 24.028,1.572 24.006,1.539 23.998,1.5 23.998,-0.9 23.998,-1.79 5.402,-1.79 5.402,-1.7 5.402,1.358 5.972,1.928 6.572,2.528 6.594,2.561 6.602,2.6 6.602,11.758 10.572,15.728 10.594,15.761 10.602,15.8 10.602,17.858 11.242,18.498 11.858,18.498
FMU_VDD_5V on PWR1 (split plane): 33.19,0 33.191,-0.014 33.183,-0.176 33.157,-0.35 33.114,-0.52 33.055,-0.686 32.98,-0.845 32.89,-0.995 32.785,-1.137 32.667,-1.267 32.537,-1.385 32.395,-1.49 32.245,-1.58 32.086,-1.655 31.92,-1.714 31.75,-1.757 31.576,-1.783 31.414,-1.791 31.4,-1.79 24.202,-1.79 24.202,-0.9 24.202,1.458 24.872,2.128 24.894,2.161 24.902,2.198 27.8,2.198 27.839,2.206 27.872,2.228 31.272,5.628 31.294,5.661 31.302,5.7 31.302,12.298 33.19,12.298
VDD_3V3_SD_CARD on PWR1 (split plane): 15.728,18.228 15.761,18.206 15.8,18.198 21.158,18.198 23.498,15.858 23.498,11.3 23.506,11.261 23.528,11.228 24.728,10.028 24.761,10.006 24.8,9.998 26.758,9.998 31.056,5.7 27.758,2.402 24.902,2.402 24.902,6.9 24.894,6.939 24.872,6.972 24.072,7.772 24.039,7.794 24,7.802 21.242,7.802 20.802,8.242 20.802,15.1 20.794,15.139 20.772,15.172 20.262,15.682 20.229,15.704 20.19,15.712 18.91,15.712 18.871,15.704 18.838,15.682 18.428,15.272 18.406,15.239 18.398,15.2 18.398,14.242 17.858,13.702 13.942,13.702 12.902,14.742 12.902,16 12.894,16.039 12.872,16.072 12.502,16.442 12.502,16.6 12.502,17.8 12.502,18.1 12.494,18.139 12.472,18.172 11.972,18.672 11.939,18.694 11.9,18.702 11.2,18.702 11.161,18.694 11.128,18.672 10.428,17.972 10.406,17.939 10.398,17.9 10.398,15.842 8.902,14.346 8.902,18.458 10.142,19.698 14.258,19.698
VDD_5V_IN on PWR1 (split plane): 16.628,20.528 16.661,20.506 16.7,20.498 26.45,20.498 26.456,20.499 28.728,18.228 28.761,18.206 28.8,18.198 29.719,18.198 31.098,16.819 31.098,16 31.098,12.4 31.098,5.946 26.872,10.172 26.839,10.194 26.8,10.202 24.842,10.202 23.702,11.342 23.702,15.9 23.694,15.939 23.672,15.972 21.272,18.372 21.239,18.394 21.2,18.402 15.842,18.402 14.372,19.872 14.339,19.894 14.3,19.902 10.1,19.902 10.061,19.894 10.028,19.872 8.728,18.572 8.706,18.539 8.698,18.5 8.698,14.142 8.428,13.872 6.428,11.872 6.406,11.839 6.398,11.8 6.398,5.302 2.742,5.302 2.502,5.542 2.502,10.658 4.278,12.434 5.854,14.01 5.876,14.043 5.884,14.082 5.884,18.542 8.441,21.098 16.058,21.098
VDD_3V3_SENSORS1 on PWR1 (split plane): 31.576,26.183 31.75,26.157 31.92,26.114 32.086,26.055 32.245,25.98 32.395,25.89 32.537,25.785 32.667,25.667 32.785,25.537 32.89,25.395 32.98,25.245 33.055,25.086 33.114,24.92 33.157,24.75 33.183,24.576 33.191,24.414 33.19,24.4 33.19,20.002 30.042,20.002 28.402,21.642 28.402,23.1 28.394,23.139 28.372,23.172 27.272,24.272 27.239,24.294 27.2,24.302 19.142,24.302 18.902,24.542 18.902,26.19 31.4,26.19 31.414,26.191
GND on GND2 (split plane): 31.576,26.183 31.75,26.157 31.92,26.114 32.086,26.055 32.245,25.98 32.395,25.89 32.537,25.785 32.667,25.667 32.785,25.537 32.89,25.395 32.98,25.245 33.055,25.086 33.114,24.92 33.157,24.75 33.183,24.576 33.191,24.414 33.19,24.4 33.19,0 33.191,-0.014 33.183,-0.176 33.157,-0.35 33.114,-0.52 33.055,-0.686 32.98,-0.845 32.89,-0.995 32.785,-1.137 32.667,-1.267 32.537,-1.385 32.395,-1.49 32.245,-1.58 32.086,-1.655 31.92,-1.714 31.75,-1.757 31.576,-1.783 31.414,-1.791 31.4,-1.79 0,-1.79 -0.014,-1.791 -0.176,-1.783 -0.35,-1.757 -0.52,-1.714 -0.686,-1.655 -0.845,-1.58 -0.995,-1.49 -1.137,-1.385 -1.267,-1.267 -1.385,-1.137 -1.49,-0.995 -1.58,-0.845 -1.655,-0.686 -1.714,-0.52 -1.757,-0.35 -1.783,-0.176 -1.791,-0.014 -1.79,0 -1.79,24.4 -1.791,24.414 -1.783,24.576 -1.757,24.75 -1.714,24.92 -1.655,25.086 -1.58,25.245 -1.49,25.395 -1.385,25.537 -1.267,25.667 -1.137,25.785 -0.995,25.89 -0.845,25.98 -0.686,26.055 -0.52,26.114 -0.35,26.157 -0.176,26.183 -0.014,26.191 0,26.19 31.4,26.19 31.414,26.191
GND on GND3 (split plane): 31.576,26.183 31.75,26.157 31.92,26.114 32.086,26.055 32.245,25.98 32.395,25.89 32.537,25.785 32.667,25.667 32.785,25.537 32.89,25.395 32.98,25.245 33.055,25.086 33.114,24.92 33.157,24.75 33.183,24.576 33.191,24.414 33.19,24.4 33.19,0 33.191,-0.014 33.183,-0.176 33.157,-0.35 33.114,-0.52 33.055,-0.686 32.98,-0.845 32.89,-0.995 32.785,-1.137 32.667,-1.267 32.537,-1.385 32.395,-1.49 32.245,-1.58 32.086,-1.655 31.92,-1.714 31.75,-1.757 31.576,-1.783 31.414,-1.791 31.4,-1.79 0,-1.79 -0.014,-1.791 -0.176,-1.783 -0.35,-1.757 -0.52,-1.714 -0.686,-1.655 -0.845,-1.58 -0.995,-1.49 -1.137,-1.385 -1.267,-1.267 -1.385,-1.137 -1.49,-0.995 -1.58,-0.845 -1.655,-0.686 -1.714,-0.52 -1.757,-0.35 -1.783,-0.176 -1.791,-0.014 -1.79,0 -1.79,24.4 -1.791,24.414 -1.783,24.576 -1.757,24.75 -1.714,24.92 -1.655,25.086 -1.58,25.245 -1.49,25.395 -1.385,25.537 -1.267,25.667 -1.137,25.785 -0.995,25.89 -0.845,25.98 -0.686,26.055 -0.52,26.114 -0.35,26.157 -0.176,26.183 -0.014,26.191 0,26.19 31.4,26.19 31.414,26.191

## Other copper
PWR1 (plane layer: these items are gaps in the copper):
  lines w0.2: -2.3,2.2 -1,2.2 -0.1,3.1 -0.1,17.3 0.5,17.9 0.5,20 4.718,24.218 15.382,24.218 17.3,22.3 26.1,22.3 26.5,21.9 26.5,20.6 28.8,18.3 29.761,18.3 31.2,16.861 31.2,16 31.2,12.4 ; -0.1,11.9 1.3,11.9 2.2,12.8 ; 4,21.6 3.8,21.4 3.8,14.4 2.2,12.8 ; 5.3,-2.3 5.3,-1.7 5.3,1.4 5.9,2 6.5,2.6 6.5,11.8 10.5,15.8 10.5,17.9 11.2,18.6 11.9,18.6 12.4,18.1 12.4,17.8 12.4,16.6 12.4,16.4 12.8,16 12.8,14.7 13.9,13.6 17.9,13.6 18.5,14.2 18.5,15.2 18.91,15.61 20.19,15.61 20.7,15.1 20.7,8.2 21.2,7.7 24,7.7 24.8,6.9 24.8,2.2 24.1,1.5 24.1,-0.9 24.1,-2.4 ; 6.5,5.2 2.7,5.2 2.4,5.5 2.4,10.7 4.206,12.506 5.782,14.082 5.782,18.584 8.398,21.2 16.1,21.2 16.7,20.6 26.45,20.6 ; 8.5,13.8 8.8,14.1 8.8,18.5 10.1,19.8 14.3,19.8 15.8,18.3 21.2,18.3 23.6,15.9 23.6,11.3 24.8,10.1 26.8,10.1 31.2,5.7 ; 12.1,24.1 12.1,23.966 11.134,23 11,23 5.4,23 3.1,20.7 2.2,19.8 2.2,12.8 ; 18.8,26.7 18.8,24.5 19.1,24.2 27.2,24.2 28.3,23.1 28.3,21.6 30,19.9 33.7,19.9 ; 24.9,2.3 27.8,2.3 31.2,5.7 ; 33.7,12.4 31.2,12.4 ; 31.2,5.7 31.2,12.4

## Silkscreen, mask and mechanical layers (free items; w line width, h text height)
Top Overlay:
  lines w0.26: 6.204,17.8 2.6,17.8 ; 2.6,17.8 3.55,17.5 3.55,18.1 2.6,17.8
  text "FLIGHT" at 2.7,16.35 h0.66
Bottom Overlay:
  circle w0.25: c28.75,2.4 r0.125
  circle w0.3: c3.2,7.4 r0.15
  lines w0.12: -0.23,6.44 1.63,6.44 ; -0.23,17.96 1.63,17.96 ; 25.67,1.44 27.53,1.44 ; 25.67,22.96 27.53,22.96
  lines w0.2: -2.3,0 ccw(c0,0) 0,-2.3 31.4,-2.3 ccw(c31.4,0) 33.7,0 33.7,24.4 ccw(c31.4,24.4) 31.4,26.7 0,26.7 ccw(c0,24.4) -2.3,24.4 -2.3,0
Mechanical 1:
  lines w0.1: -2.3,0 ccw(c0,0) 0,-2.3 ; -2.3,0 ccw(c0,0) 0,-2.3 ; -2.3,0 -2.3,24.4 ; -2.3,0 -2.3,24.4 ; -2.3,24.4 cw(c0,24.4) 0,26.7 ccw(c0,24.4) -2.3,24.4 ; 0,-2.3 31.4,-2.3 ; 0,-2.3 31.4,-2.3 ; 31.4,-2.3 ccw(c31.4,0) 33.7,0 ; 31.4,-2.3 ccw(c31.4,0) 33.7,0 ; 33.7,0 33.7,24.4 ; 33.7,0 33.7,24.4 ; 33.7,24.4 ccw(c31.4,24.4) 31.4,26.7 cw(c31.4,24.4) 33.7,24.4 ; 0,26.7 31.4,26.7 0,26.7
Bottom Assembly:
  lines w0.12: -0.23,6.44 1.63,6.44 1.63,17.96 -0.23,17.96 -0.23,6.44 ; 0.101,7.07 0.672,7.4 0.101,7.73 0.101,7.07 ; 25.67,1.44 25.67,22.96 27.53,22.96 27.53,1.44 25.67,1.44 ; 26.345,2.4 27.241,1.882 27.241,2.917 26.345,2.4
Bottom Courtyard:
  circle w0.05: c26.6,12.2 r0.25
  circle w0.05: c0.7,12.2 r0.25
  lines w0.05: 0.35,12.2 1.05,12.2 ; 0.7,11.85 0.7,12.55 ; 26.25,12.2 26.95,12.2 ; 26.6,11.85 26.6,12.55 ; -1.485,6.25 -0.73,6.25 -0.73,5.94 2.13,5.94 2.13,6.25 2.885,6.25 2.885,18.15 2.13,18.15 2.13,18.46 -0.73,18.46 -0.73,18.15 -1.485,18.15 -1.485,6.25 ; 24.665,1.5 24.665,22.9 25.17,22.9 25.17,23.46 28.03,23.46 28.03,22.9 28.535,22.9 28.535,1.5 28.03,1.5 28.03,0.94 25.17,0.94 25.17,1.5 24.665,1.5
Bottom Component Outline:
  lines w0.025: -0.225,6.44 1.625,6.44 1.625,17.96 -0.225,17.96 -0.225,6.44 ; 25.675,1.44 25.675,22.96 27.525,22.96 27.525,1.44 25.675,1.44
Bottom Designator:
  text ".Designator" at 0.7,12.2 h1.2 r270
  text ".Designator" at 26.6,12.2 h1.2 r270

## Text inside footprints (layer, text, board x,y; h text height)
D2: Mechanical 13 "+" at 5.612,2.647 h0.5 r270
D3: Mechanical 13 "+" at 4.164,2.662 h0.5 r270
D4: Mechanical 13 "+" at 2.494,2.647 h0.5 r270
J2: Top Overlay "1" at -1.05,15.1 h0.6; Top Overlay "34" at 2.275,8.9 h0.6